# Altium PCB PCB1.PcbDoc
Units mm, origin at the board's own origin, x right, y up, seen from the top; angles counter-clockwise.
Board outline 56.39 x 47.24 mm, 2 copper layers (Top Layer, Bottom Layer); 26 components, 25 nets, 109 pads, 52 vias.
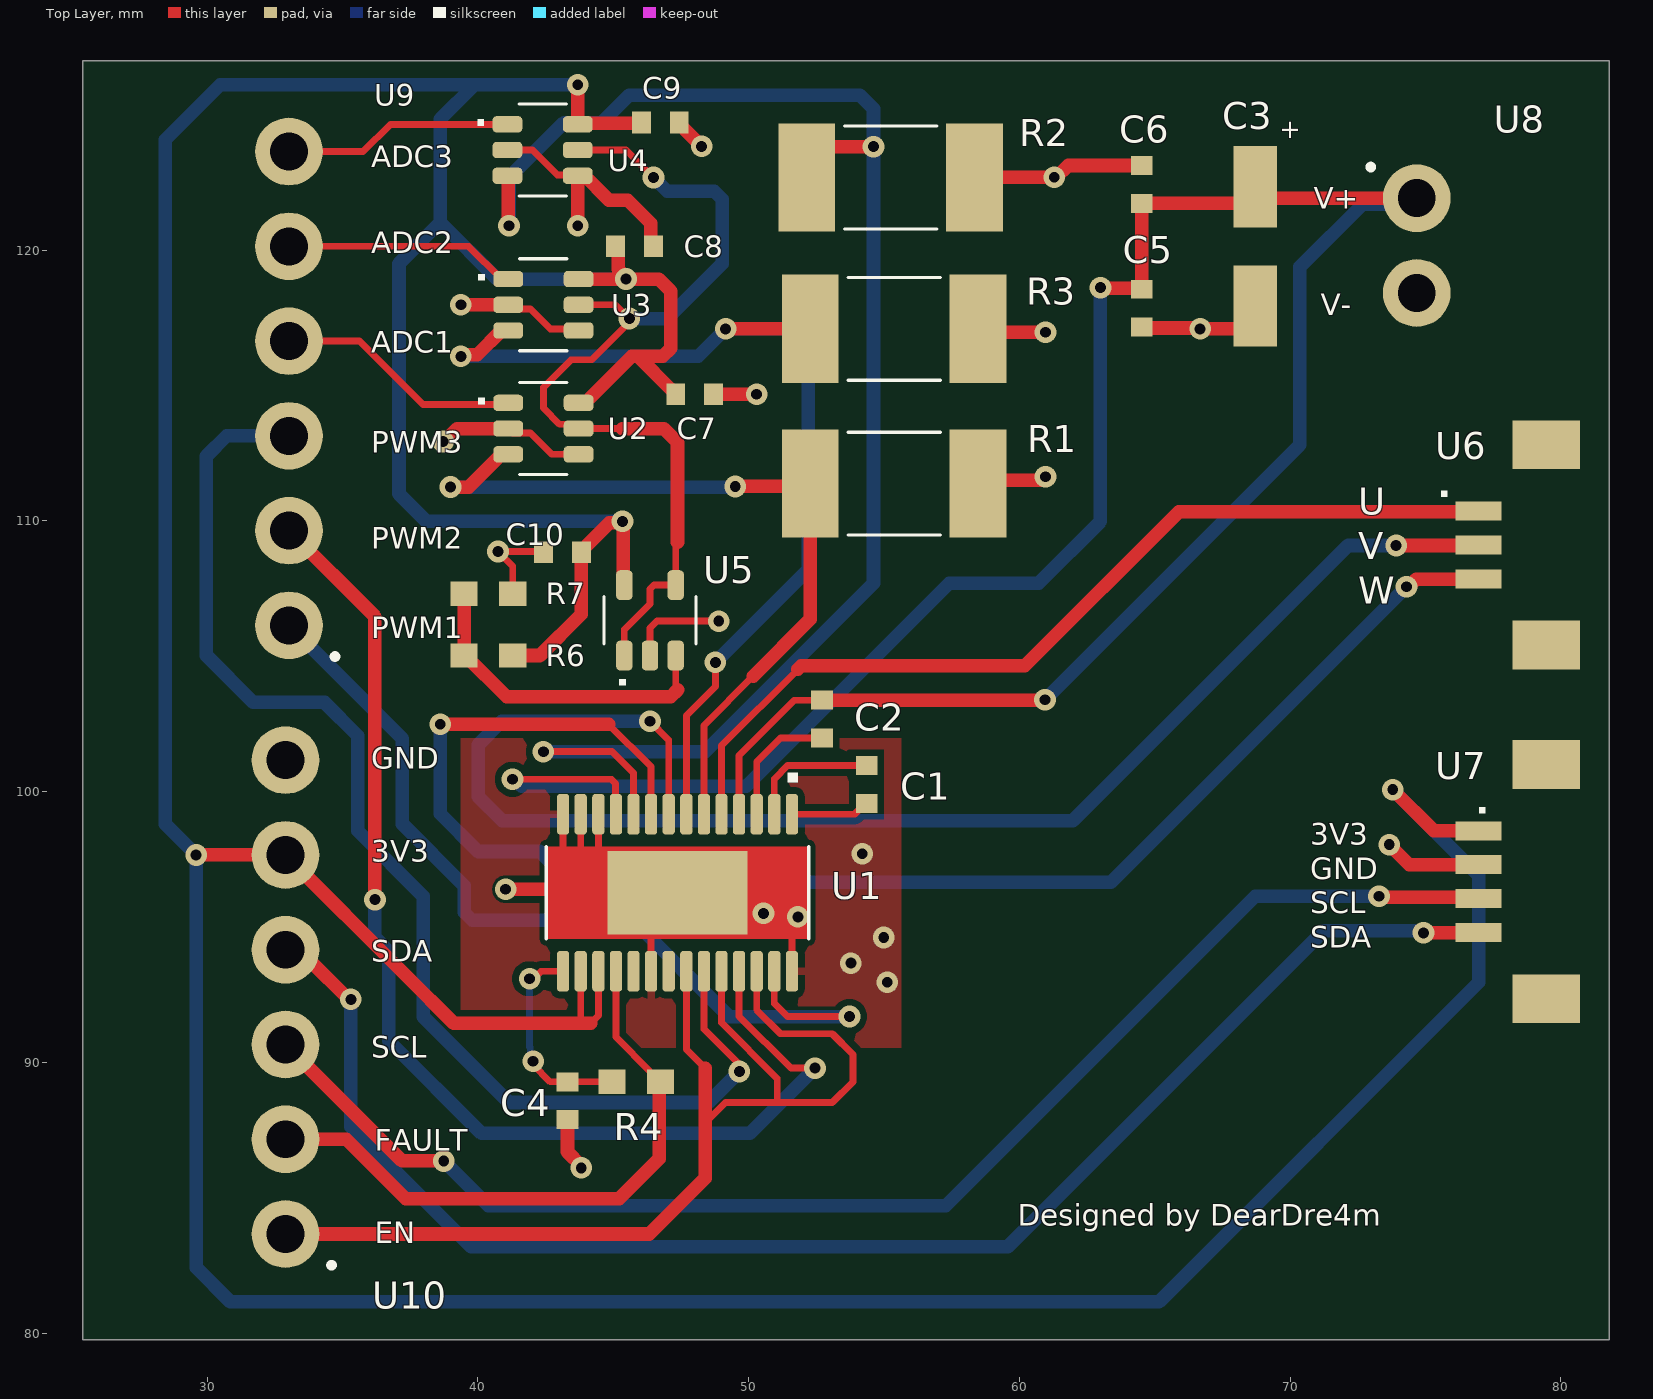
[diagram p0: Top Layer view]
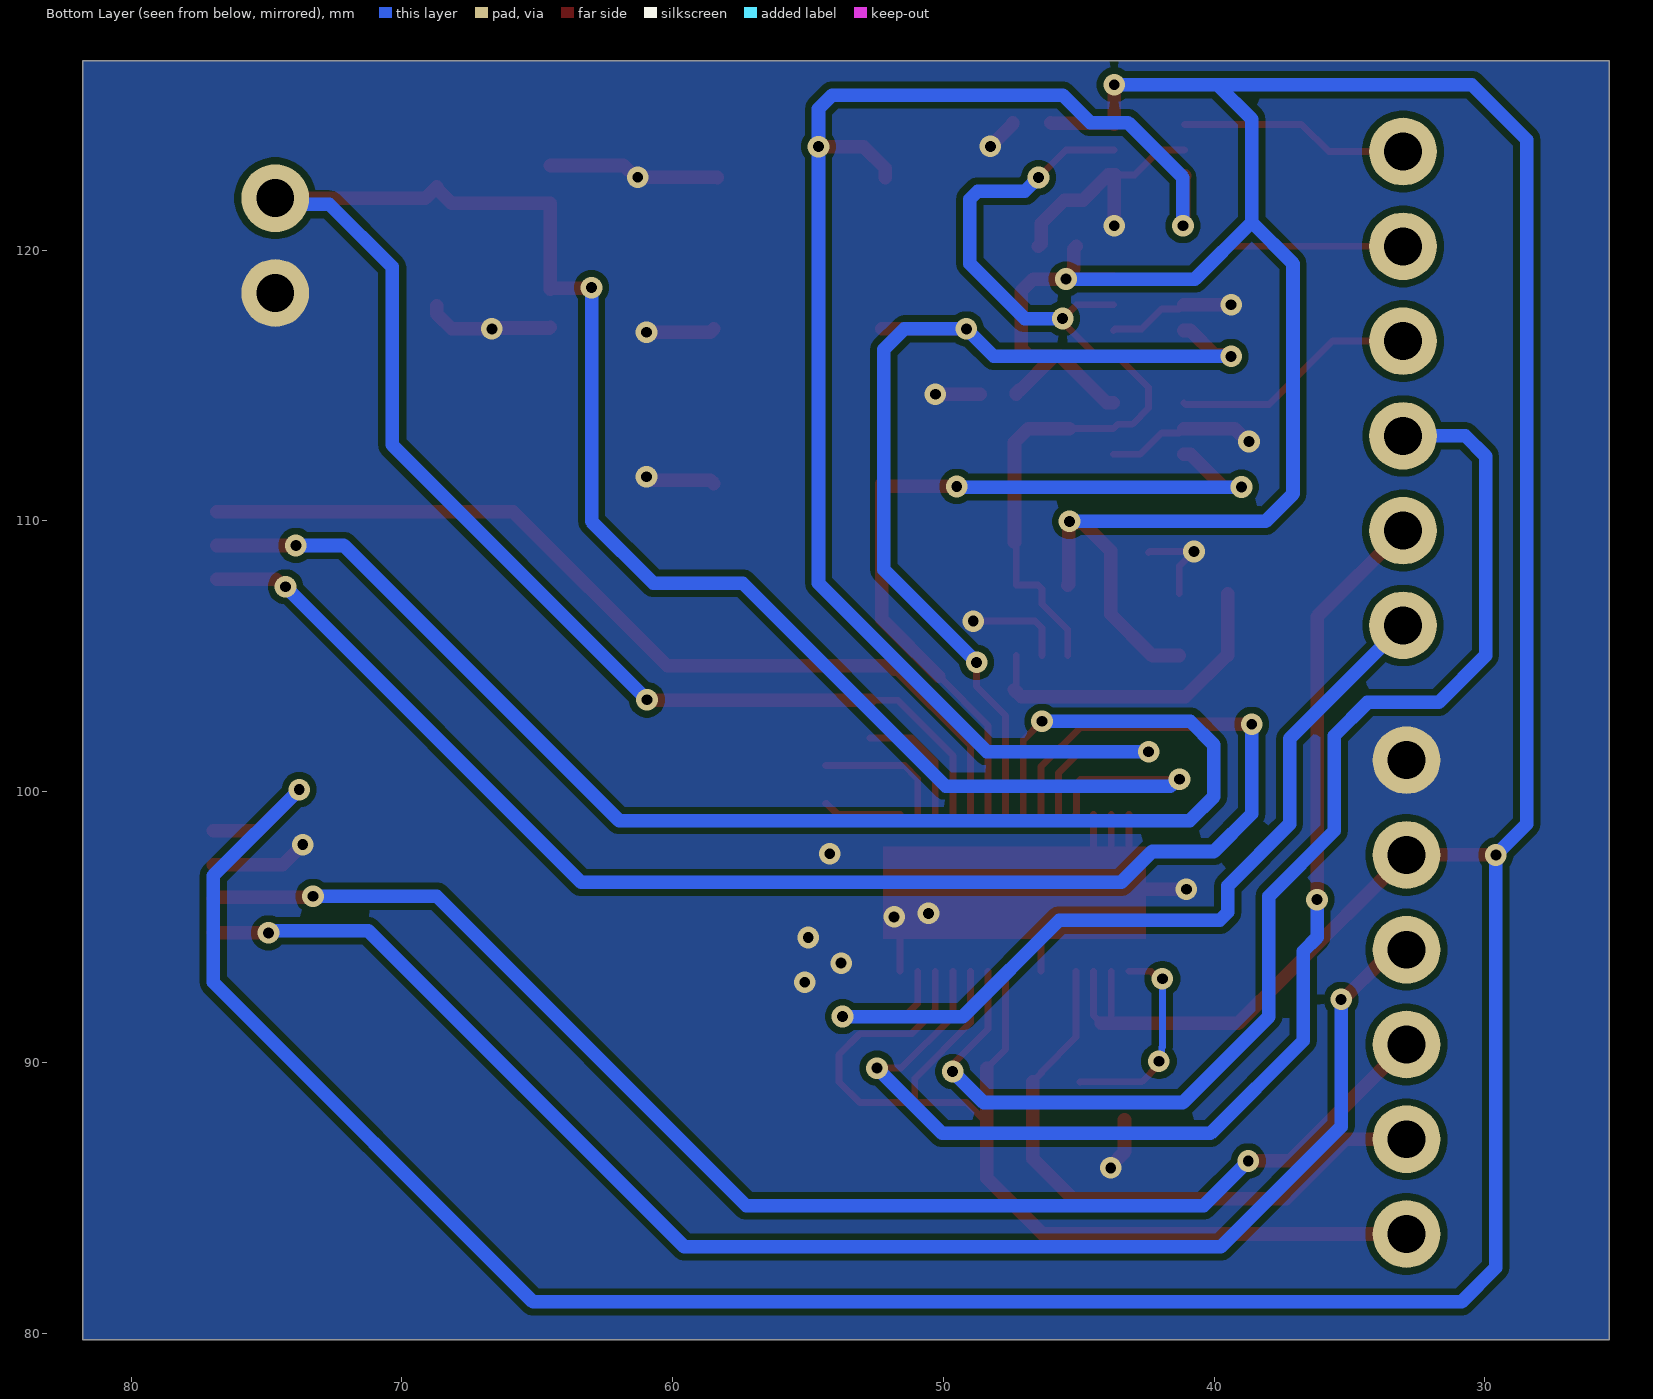
[diagram p1: Bottom Layer view, seen from below]

## Layer stack, top to bottom
Top Solder: solder mask 0.0102, Solder Resist, Dk 3.5
Top Layer: signal copper 0.0356
Dielectric 1: dielectric 0.32, FR-4, Dk 4.8
Bottom Layer: signal copper 0.0356
Bottom Solder: solder mask 0.0102, Solder Resist, Dk 3.5

## Board outline
25.4,127 81.788,127 81.788,79.756 25.4,79.756

## Design rules (kind name [scope] priority, off if disabled: settings)
Clearance Clearance_U1 [IsPad AND InComponent('U1') vs IsPad AND InComponent('U1')] p1: gap=0.18 ignorepadtopadclearanceinfootprint=FALSE
Clearance [All] p2: gap=0.127 ignorepadtopadclearanceinfootprint=FALSE
HoleSize [All] p1: absolutevalues=TRUE maxlimit=2.54 minlimit=0.3 maxpercent=80.000 minpercent=20.000
MinimumSolderMaskSliver [All] p1: minsoldermaskwidth=0.09
PolygonConnect [All] p1: connectstyle=Relief reliefconductorwidth=0.254 reliefentries=4 polygonreliefangle="90 Angle" airgapwidth=0.254
RoutingVias [All] p1: holewidth=0.711 width=1.27 viastyle="Through Hole" minholewidth=0.711 minwidth=1.27 maxholewidth=0.711 maxwidth=1.27
SilkToSolderMaskClearance [IsPad] p1: minsilkscreentomaskgap=0.15 clearancetoexposedcopper=TRUE
SolderMaskExpansion [All] p1: expansion=0.102 istentingtop=FALSE
SupplyNets "Schematic Supply Nets_3" [InNet('GND')] p1: voltage=0.000
SupplyNets "Schematic Supply Nets_2" [InNet('VM')] p2: voltage=0.000
SupplyNets "Schematic Supply Nets_1" [InNet('3V3')] p3: voltage=0.000
Width [All] p1: maxlimit=0.5 minlimit=0.125 preferedwidth=0.254
27 further rules are at their usual default settings.

## Components (designator, comment, footprint, x,y, rotation, side; value= is the part's Value field where it differs from the comment)
C1 "0.01uF 100V" CAP_0603_1608 54.356,100.265 r270 top
C2 "0.1uF" CAP_0603_1608 52.705,102.678 r90 top
C3 "22uF" ECAP_SMD_D5_H5.4 68.707,120.142 r270 top
C4 "0.47uF" CAP_0603_1608 43.307,88.584 r270 top
C5 "0.1uF" CAP_0603_1608 64.516,117.856 r90 top
C6 "0.1uF" CAP_0603_1608 64.516,122.428 r270 top
C7 "0.1uF" CAP_0603_1608 48.006,114.681 r0 top
C8 "0.1uF" CAP_0603_1608 45.785,120.142 r0 top
C9 "0.1uF" CAP_0603_1608 46.736,124.714 r0 top
C10 "0.1uF" CAP_0603_1608 43.118,108.839 r180 top
R1 "0.03R" R2512_SHUNT_2P 55.372,111.379 r0 top
R2 "0.03R" R2512_SHUNT_2P 55.372,117.094 r0 top
R3 "0.03R" R2512_SHUNT_2P 55.245,122.682 r0 top
R4 "10K" RES_0603_1608 45.847,89.281 r0 top
R6 "10K" RES_0603_1608 40.386,105.029 r0 top
R7 "10K" RES_0603_1608 40.386,107.315 r0 top
U1 "DRV8313PWPR" "HTSSOP-28 PowerPAD" 47.371,96.266 r270 top
U2 "INA181A1IDBVR" SOT23-6_DBV 42.418,113.411 r0 top
U3 "INA181A1IDBVR" SOT23-6_DBV 42.418,117.983 r0 top
U4 "INA181A1IDBVR" SOT23-6_DBV 42.388,123.698 r0 top
U5 "TLV9001IDBVR" SOT23-5_DBV 46.355,106.329 r90 top
U6 "MX1.25_3P" MX1.25_3P_SMT 76.962,109.113 r270 top
U7 "MX1.25_4P" MX1.25_4P_SMT 76.962,96.677 r270 top
U8 "KF2EDG_3.5_2P_RA" KF2EDG_3.5_2P_RA 74.676,121.92 r270 top
U9 "KF2EDG_3.5_6P_RA" KF2EDG_3.5_6P_RA#1 33.02,106.142 r90 top
U10 "KF2EDG_3.5_6P_RA" KF2EDG_3.5_6P_RA#2 32.893,83.663 r90 top

## Footprints (in the part's own frame and the unit in brackets; to place one, negate y for a bottom-side part, rotate by r counter-clockwise, add the part's x,y. Pads: shape width x height; smd on the part's side, far side on the other; paste and mask are expansions set on the pad)
CAP_0603_1608 [mm]
  rect 0.7x0.8 smd mask+0: 1(-0.7,0) 2(0.7,0)
ECAP_SMD_D5_H5.4 [mm]
  rect 3x1.6 smd mask+0: 1(-2.2,0) 2(2.2,0)
"HTSSOP-28 PowerPAD" [mm] "Need to design Vias"
  rrect50% 1.5x0.45 smd: 1(-2.9,4.225) 2(-2.9,3.575) 3(-2.9,2.925) 4(-2.9,2.275) 5(-2.9,1.625) 6(-2.9,0.975) 7(-2.9,0.325) 8(-2.9,-0.325) 9(-2.9,-0.975) 10(-2.9,-1.625) 11(-2.9,-2.275) 12(-2.9,-2.925) 13(-2.9,-3.575) 14(-2.9,-4.225) 15(2.9,-4.225) 16(2.9,-3.575) 17(2.9,-2.925) 18(2.9,-2.275) 19(2.9,-1.625) 20(2.9,-0.975) 21(2.9,-0.325) 22(2.9,0.325) 23(2.9,0.975) 24(2.9,1.625) 25(2.9,2.275) 26(2.9,2.925) 27(2.9,3.575) 28(2.9,4.225)
  rect 3.1x5.18 smd paste+0 mask+0: 29(0,0)
  Top Layer region: -1.7,-4.85 1.7,-4.85 1.7,4.85 -1.7,4.85
  silkscreen extent -4.45,-4.85 1.7,4.85
KF2EDG_3.5_2P_RA [mm]
  round 2.5 hole 1.4: 1(0,0) 2(3.5,0)
  silkscreen extent -1.22,-1.77 -1.08,-1.63
KF2EDG_3.5_6P_RA#1 [mm]
  round 2.5 hole 1.4: 1(0,0) 2(3.5,0) 3(7,0) 4(10.5,0) 5(14,0) 6(17.5,0)
  silkscreen extent -1.22,-1.77 -1.08,-1.63
KF2EDG_3.5_6P_RA#2 [mm]
  round 2.5 hole 1.4: 1(0,0) 2(3.5,0) 3(7,0) 4(10.5,0) 5(14,0)
  round 2.5 hole 1.4 mask+0.102: 6(17.5,0)
  silkscreen extent -1.22,-1.77 -1.08,-1.63
MX1.25_3P_SMT [mm]
  rect 0.7x1.7 smd: 1(-1.25,0) 2(0,0) 3(1.25,0)
  rect 1.8x2.5 smd: 4(-3.7,2.5) 5(3.7,2.5)
  silkscreen extent -2.01,-1.4 -1.76,-1.15
MX1.25_4P_SMT [mm]
  rect 0.7x1.7 smd: 1(-1.875,0) 2(-0.625,0) 3(0.625,0) 4(1.875,0)
  rect 1.8x2.5 smd: 5(-4.325,2.5) 6(4.325,2.5)
  silkscreen extent -2.76,0 -2.51,0.25
R2512_SHUNT_2P [mm]
  rect 2.1x4 smd mask+0: 1(-3.1,0) 2(3.1,0)
  silkscreen extent -1.7,-1.9 1.7,1.9
RES_0603_1608 [mm]
  rect 1x0.9 smd mask+0: 1(-0.9,0) 2(0.9,0)
SOT23-5_DBV [mm]
  rrect50% 1.1x0.6 smd: 1(-1.3,0.95) 2(-1.3,0) 3(-1.3,-0.95) 4(1.3,-0.95) 5(1.3,0.95)
  silkscreen extent -2.41,-1.7 0.87,1.7
SOT23-6_DBV [mm]
  rrect50% 1.1x0.6 smd: 1(-1.3,0.95) 2(-1.3,0) 3(-1.3,-0.95) 4(1.3,-0.95) 5(1.3,0) 6(1.3,0.95)
  silkscreen extent -2.41,-1.7 0.87,1.7

## Part data
C1: library part 0.01uF_100V, "0603 X7R Ceramic Capacitor"
C2 C5 C6 C7 C8 C9 C10: library part 0.1uF_25V, "0603 X7R Ceramic Capacitor"
C3: library part 22uF_35V_ECAP, "Polarized SMD Aluminum Electrolytic Capacitor"
C4: library part 0.47uF_16V, "0603 X7R Ceramic Capacitor"
R1 R2 R3: library part 0.03R_RLP25, "大毅 RLP25 0.03R 2W采样电阻"
R4 R6 R7: library part 10K_ARG03, "Viking ARG03DTC1002 0603 Thin Film Resistor"
U1: "Three Half-H-Bridge Motor Driver MAX 26V 2.5A"
U2 U3 U4: "Bidirectional Current Sense Amplifier"

## Via types
v1: diameter 0.8, hole 0.4, Top Layer to Bottom Layer, tented both sides, 52 vias

## Nets (pads, with @x,y where several pads share a name; then routed paths per layer and width w, separated by ;. In a path a pad name is that pad's centre, name@x,y a point inside that pad or via, vN(x,y) a via of type N, cw(c..) or ccw(c..) an arc to the next point about the centre after c; other vN are vias at no path point)
3V3: C7.1 C8.1 C9.1 C10.1 R6.2 U1.16 U1.17 U2.6 U3.6 U4.6 U5.5 U7.1 U10.5 | length 204
  Top Layer w0.254: 43.796,91.44 U1.16 ; 44.158,91.44 44.446,91.728 U1.17
  Top Layer w0.5: v1(29.591,97.663) U10.5 37.338,93.218 39.116,91.44 43.796,91.44 44.158,91.44 ; R6.2 42.291,105.029 43.818,106.556 C10.1 43.818,108.889 44.854,109.925 45.282,109.925 v1(45.339,109.982) 45.372,109.949 45.372,107.662 U5.5 ; v1(43.688,126.111) U4.6 43.721,124.681 46.003,124.681 C9.1 ; U2.6 43.968,114.361 45.685,116.078 46.824,116.078 47.117,116.371 47.117,118.491 46.675,118.933 v1(45.466,118.933) ; U3.6 v1(45.466,118.933) ; C8.1 45.185,120.042 45.185,119.295 45.466,119.014 v1(45.466,118.933) ; 45.909,116.078 47.156,114.831 47.206,114.831 47.306,114.731 C7.1 ; v1(73.787,100.076) 75.311,98.552 U7.1
  Bottom Layer w0.5: v1(43.688,126.111) 39.878,126.111 ; v1(45.339,109.982) 38.1,109.982 37.084,110.998 37.084,119.507 38.608,121.031 ; v1(45.466,118.933) 40.706,118.933 38.608,121.031 ; v1(73.787,100.076) 76.962,96.901 76.962,92.964 65.151,81.153 30.861,81.153 29.591,82.423 v1(29.591,97.663) 28.448,98.806 28.448,124.079 30.48,126.111 39.878,126.111 ; 38.608,121.031 38.608,124.841 39.878,126.111
ADC_OUT1: U2.1 U9.4 | length 9.1
  Top Layer w0.254: U9.4 35.631,116.642 37.973,114.3 41.057,114.3 U2.1
ADC_OUT2: U3.1 U9.5 | length 8.6
  Top Layer w0.25: U9.5 39.659,120.142 40.868,118.933 U3.1
ADC_OUT3: U4.1 U9.6 | length 8.5
  Top Layer w0.254: U9.6 35.758,123.642 36.764,124.648 U4.1
EN: U1.22 U1.24 U1.26 U10.1 | length 42.7
  Top Layer w0.254: U1.22 47.696,90.48 48.387,89.789 ; 48.387,87.757 49.149,88.519 51.054,88.519 ; U1.24 48.996,91.466 51.054,89.408 51.054,88.519 ; U1.26 50.296,91.944 51.181,91.059 53.086,91.059 53.848,90.297 53.848,89.281 53.086,88.519 51.054,88.519
  Top Layer w0.5: U10.1 46.325,83.663 48.387,85.725 48.387,87.757 48.387,89.789
F\A\U\L\T\: R4.2 U1.18 U10.2 | length 22.9
  Top Layer w0.254: U1.18 45.096,90.932 46.374,89.654 46.374,89.604 R4.2@46.697,89.281
  Top Layer w0.5: U10.2 35.138,87.163 37.338,84.963 45.212,84.963 46.697,86.448 R4.2@46.697,89.281
GND: C3.2 C4.2 C5.1 C6.1 C7.2 C8.2 C9.2 C10.2 R1.2 R2.2 R3.2 R7.2 U1.12 U1.13 U1.14 U1.20 U1.28 U1.29 U2.2 U2.4 U3.2 U3.4 U4.2 U4.4 U5.2 U7.2 U8.2 U10.6 | length 65.2
  Top Layer w0.254: v1(40.743,108.868) 42.389,108.868 C10.2 ; v1@40.767,108.839 41.286,108.32 R7.2 ; U4.2 42.015,123.698 42.93,122.783 U4.4@43.653,122.783 ; U2.2 41.277,113.252 41.942,113.252 42.733,112.461 U2.4 ; U3.2 41.277,117.824 41.942,117.824 42.672,117.094 43.657,117.094 U3.4 ; U1.14 43.146,97.248 43.053,97.155 43.18,97.028 ; U1.13 43.796,97.428 43.815,97.409 ; 44.323,97.409 44.446,97.532 U1.12 ; U5.2 46.355,106.045 46.609,106.299 v1(48.895,106.299) ; U1.20 46.396,95.291 U1.29@47.371,95.758 ; 51.435,95.631 51.596,95.47 U1.28
  Top Layer w0.5: v1@38.735,112.903 39.243,113.411 U2.2 ; v1(39.37,117.983) U3.2 ; v1(41.021,96.393) 43.434,96.393 43.688,96.647 ; C4.2 43.307,86.695 43.815,86.187 v1(43.815,86.106) ; U4.4@43.653,122.783 43.903,122.783 44.841,121.845 45.532,121.845 46.385,120.992 46.385,120.242 C8.2 ; v1(43.688,120.904) U4.4 ; C9.2 47.436,124.664 48.26,123.84 v1(48.26,123.833) v1@48.26,123.825 ; C7.2@48.641,114.681 C7.2 v1(50.292,114.681) ; R3.2 58.357,122.694 v1(61.283,122.694) 61.365,122.694 61.799,123.128 C6.1 ; R1.2 58.599,111.506 60.752,111.506 60.879,111.633 v1(60.96,111.633) ; R2.2 58.599,116.967 v1(60.96,116.967) ; C5.1 64.547,117.125 66.644,117.125 v1(66.675,117.094) 68.157,117.094 68.707,117.644 C3.2 ; v1(73.66,98.044) 74.402,97.302 U7.2
  other v1: 55.118,92.964 53.774,93.668 54.991,94.615 51.816,95.377 50.546,95.504 54.195,97.709 38.711,112.932
IN1+: R1.1 U1.6 U2.3 | length 29.8
  Top Layer w0.254: U1.6 48.346,102.448 50.165,104.267
  Top Layer w0.5: v1(38.989,111.252) 39.659,111.252 40.868,112.461 U2.3 ; v1(49.505,111.274) 52.167,111.274 R1.1 52.272,106.374 50.165,104.267
  Bottom Layer w0.5: v1(38.989,111.252) v1@49.483,111.252
IN2+: R2.1 U1.7 U3.3 | length 37.9
  Top Layer w0.254: U1.7 47.696,102.814 48.768,103.886 v1(48.768,104.775)
  Top Layer w0.5: v1(39.37,116.078) 39.427,116.135 39.97,116.135 40.868,117.033 U3.3 ; v1(49.149,117.094) R2.1
  Bottom Layer w0.5: v1(39.37,116.078) 48.133,116.078 v1(49.149,117.094) 51.435,117.094 52.197,116.332 52.197,108.204 v1(48.768,104.775)
IN3+: R3.1 U1.10 U4.3 | length 59.2
  Top Layer w0.254: v1(42.418,101.473) 42.426,101.481 44.95,101.481 45.746,100.685 U1.10
  Top Layer w0.5: U4.3 41.118,122.718 41.118,120.934 v1(41.148,120.904) ; R3.1 52.145,123.025 52.945,123.825 v1(54.61,123.825)
  Bottom Layer w0.5: v1(41.148,120.904) 41.148,122.682 43.18,124.714 44.577,124.714 45.593,125.73 54.102,125.73 54.61,125.222 54.61,107.696 48.387,101.473 v1(42.418,101.473)
NetC1_1: C1.1 U1.2 | length 4.9
  Top Layer w0.254: U1.2 50.946,100.476 51.435,100.965 C1.1
NetC1_2: C1.2 U1.1 | length 2.9
  Top Layer w0.254: U1.1 53.907,99.166 54.306,99.565 C1.2
NetC2_1: C2.1 U1.3 | length 4.7
  Top Layer w0.254: U1.3 50.296,101.096 51.178,101.978 C2.1
NetR6_1: R6.1 R7.1 U5.3 | length 12.2
  Top Layer w0.254: U5.3 47.305,103.825 47.371,103.759
  Top Layer w0.5: R6.1 R7.1 ; R6.1@39.536,105.029 41.06,103.505 47.117,103.505 47.371,103.759
PWM_IN1: U1.27 U9.1 | length 33.3
  Top Layer w0.254: U1.27 50.946,92.183 51.435,91.694 v1(53.721,91.694)
  Bottom Layer w0.5: U9.1 37.211,101.951 37.211,98.806 39.497,96.52 39.497,95.543 39.79,95.25 45.72,95.25 49.276,91.694 v1(53.721,91.694)
PWM_IN2: U1.25 U9.2 | length 43.8
  Top Layer w0.254: U1.25 49.646,91.705 51.562,89.789 v1(52.451,89.789)
  Top Layer w0.5: U9.2 36.195,106.467 v1(36.195,96.012)
  Bottom Layer w0.5: v1(36.195,96.012) 36.195,94.615 36.703,94.107 36.703,90.805 40.132,87.376 50.038,87.376 v1(52.451,89.789)
PWM_IN3: U1.23 U9.3 | length 46.6
  Top Layer w0.254: U1.23 48.346,91.227 49.657,89.916 v1(49.657,89.662)
  Bottom Layer w0.5: U9.3 30.719,113.142 29.972,112.395 29.972,105.029 31.706,103.295 34.334,103.295 35.56,102.069 35.56,98.552 37.973,96.139 37.973,91.694 41.148,88.519 48.514,88.519 v1(49.657,89.662)
REF: U2.5 U3.5 U4.5 U5.1 U5.4 | length 34.5
  Top Layer w0.254: U4.5 45.466,123.698 v1(46.482,122.682) ; U3.5 45.085,117.983 v1(45.593,117.475) 45.593,117.348 44.196,115.951 43.434,115.951 42.418,114.935 42.418,114.173 43.021,113.57 43.559,113.57 U2.5 45.339,113.411 ; U5.1 45.405,105.984 46.355,106.934 46.355,107.48 46.504,107.629 U5.4 47.305,109.154 47.371,109.22
  Top Layer w0.5: 45.339,113.411 46.863,113.411 47.372,112.902 47.371,112.901 47.371,109.22
  Bottom Layer w0.5: v1(45.593,117.475) 46.99,117.475 49.022,119.507 49.022,121.881 48.729,122.174 46.99,122.174 v1(46.482,122.682)
SCL: U7.3 U10.3 | length 51.3
  Top Layer w0.5: U10.3 37.196,86.36 v1(38.735,86.36) ; v1(73.279,96.139) 73.323,96.095 76.918,96.095 U7.3
  Bottom Layer w0.5: v1(38.735,86.36) 40.386,84.709 57.277,84.709 68.707,96.139 v1(73.279,96.139)
SDA: U7.4 U10.4 | length 56.1
  Top Layer w0.5: U10.4 33.276,93.78 33.774,93.78 35.225,92.329 v1(35.306,92.329) ; v1(74.926,94.784) 74.935,94.793 76.953,94.793 U7.4
  Bottom Layer w0.5: v1(35.306,92.329) 35.306,87.63 39.751,83.185 59.563,83.185 71.247,94.869 74.676,94.869 v1@74.803,94.742
U: U1.5 U6.1 | length 34
  Top Layer w0.254: U1.5 48.996,101.701 51.816,104.521
  Top Layer w0.5: 51.816,104.521 51.943,104.648 60.198,104.648 65.893,110.343 U6.1@76.835,110.343
V: U1.8 U6.2 | length 53.7
  Top Layer w0.254: v1(46.355,102.601) 47.046,101.91 U1.8
  Top Layer w0.5: v1(73.914,109.093) U6.2@76.835,109.093
  Bottom Layer w0.5: v1(46.355,102.601) 40.879,102.601 40.005,101.727 40.005,99.822 40.894,98.933 61.976,98.933 72.136,109.093 v1(73.914,109.093)
V3P3OUT: C4.1 R4.1 U1.15 | length 7.8
  Top Layer w0.254: v1(41.91,93.091) 42.058,93.091 42.333,93.366 U1.15 ; v1(42.037,90.043) 42.037,89.916 42.669,89.284 44.944,89.284 R4.1
  Bottom Layer w0.254: v1(41.91,93.091) 41.91,90.572 41.933,90.549 41.933,90.147 v1(42.037,90.043)
VM: C2.2 C3.1 C5.2 C6.2 U1.4 U1.11 U8.1 | length 94.5
  Top Layer w0.254: v1(41.275,100.457) 44.936,100.457 45.085,100.308 45.085,99.177 U1.11 ; U1.4 49.646,101.335 51.689,103.378 C2.2
  Top Layer w0.5: C2.2 v1@60.96,103.378 ; v1(62.992,118.618) 63.023,118.587 64.485,118.587 C5.2 C6.2 68.157,121.728 68.707,122.278 C3.1 69.129,121.92 U8.1
  Bottom Layer w0.5: v1(41.275,100.457) 41.356,100.457 41.61,100.203 49.911,100.203 57.404,107.696 60.706,107.696 62.992,109.982 v1(62.992,118.618) ; v1(60.946,103.393) 70.358,112.805 70.358,119.38 72.676,121.698 74.454,121.698 U8.1
W: U1.9 U6.3 | length 57.4
  Top Layer w0.254: 44.831,102.489 46.396,100.924 U1.9
  Top Layer w0.5: v1(38.608,102.489) 44.831,102.489 ; v1(74.295,107.569) 74.376,107.569 74.65,107.843 U6.3@76.835,107.843
  Bottom Layer w0.5: v1(38.608,102.489) 38.608,99.187 40.005,97.79 42.291,97.79 43.434,96.647 63.373,96.647 v1(74.295,107.569)
pads on no net: U1.19 U1.21 U6.4 U6.5 U7.5 U7.6

## Polygon pours and split planes (outlines as drawn)
GND on Top Layer "GND_L01_P001" (solid, pour order 1): 39.37,101.981 39.37,90.551 55.626,90.551 55.626,101.981
GND on Bottom Layer "GND_L02_P000" (solid, pour order 0): 81.788,127 25.4,127 25.4,79.756 81.788,79.756

## Silkscreen, mask and mechanical layers (free items; w line width, h text height)
Top Overlay:
  text "ADC3" at 36.068,123.063 h0.8
  text "V+" at 70.866,121.539 h0.8
  text "ADC2" at 36.068,119.888 h0.8
  text "V-" at 71.12,117.602 h0.8
  text "ADC1" at 36.068,116.205 h0.8
  text "PWM3" at 36.068,112.522 h0.8
  text "U" at 72.517,110.236 h1
  text "PWM2" at 36.068,108.966 h0.8
  text "V" at 72.517,108.585 h1
  text "W" at 72.517,106.934 h1
  text "PWM1" at 36.068,105.664 h0.8
  text "GND" at 36.068,100.838 h0.8
  text "3V3" at 70.739,98.044 h0.8
  text "3V3" at 36.068,97.409 h0.8
  text "GND" at 70.739,96.774 h0.8
  text "SCL" at 70.739,95.504 h0.8
  text "SDA" at 70.739,94.234 h0.8
  text "SDA" at 36.068,93.726 h0.8
  text "SCL" at 36.068,90.17 h0.8
  text "FAULT" at 36.195,86.741 h0.8
  text "Designed by DearDre4m" at 59.944,83.96 h0.8
  text "EN" at 36.195,83.312 h0.8

## Text inside footprints (layer, text, board x,y; h text height)
C3: Top Overlay "+" at 69.472,124.841 h1.2 r270
U8: Mechanical 1 "INSERT" at 78.733,122.237 h0.8 r270
U9: Mechanical 1 "INSERT" at 28.9,105.362 h0.8 r90
U10: Mechanical 1 "INSERT" at 28.773,82.883 h0.8 r90